# Altium PCB IOT_Speaker-PCB-v2.0.PcbDoc (part 1 of 3)
Units mil, origin at the board's own origin, x right, y up, seen from the top; angles counter-clockwise.
Board outline 2439.55 x 2668.91 mil, 2 copper layers (Top Layer, Bottom Layer), stack 61.811 mil thick; 126 components, 76 nets, 382 pads, 136 vias.
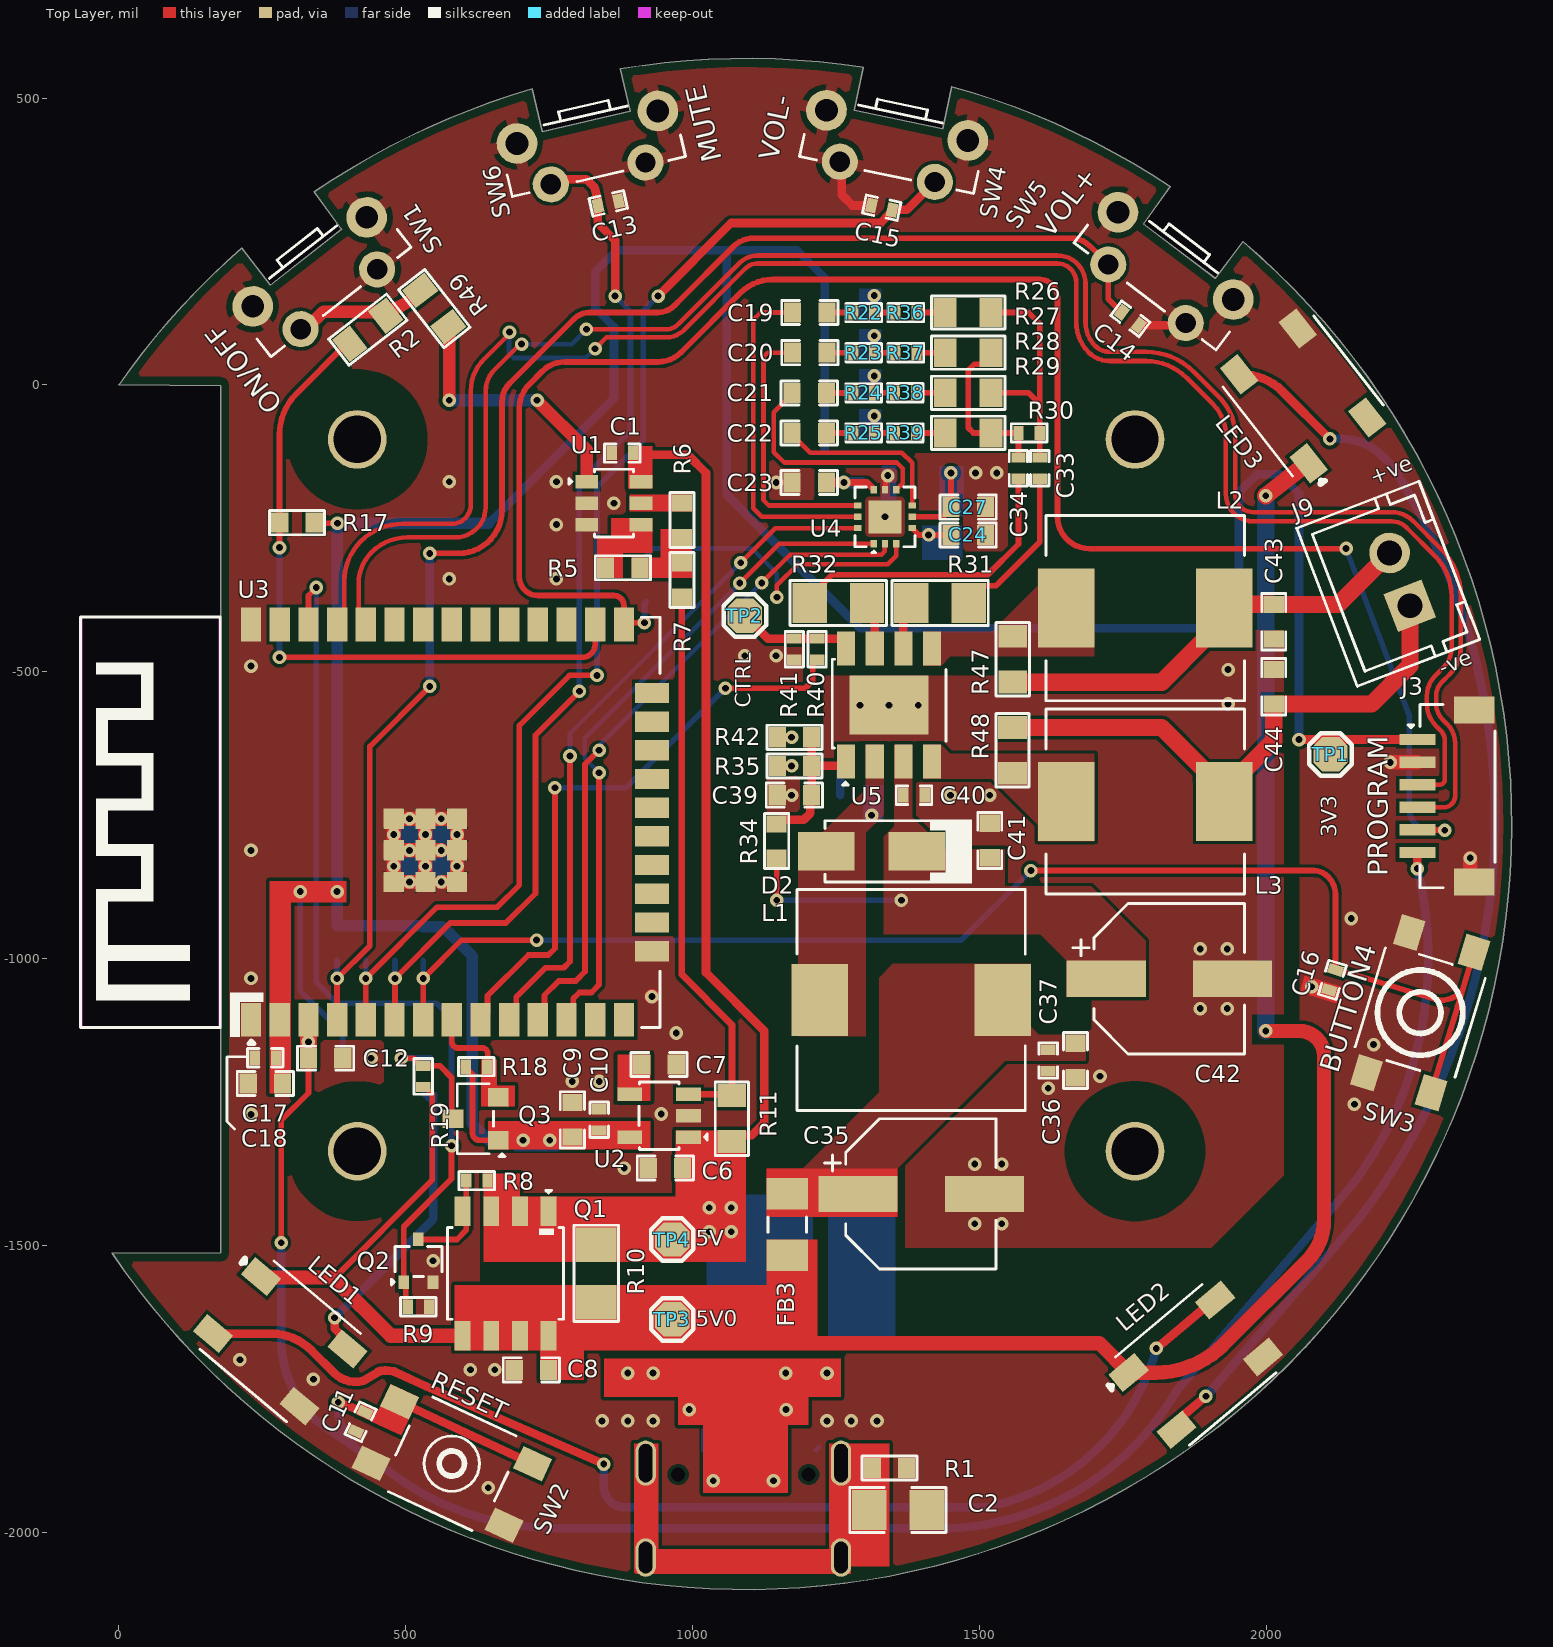
[diagram p0: Top Layer view]
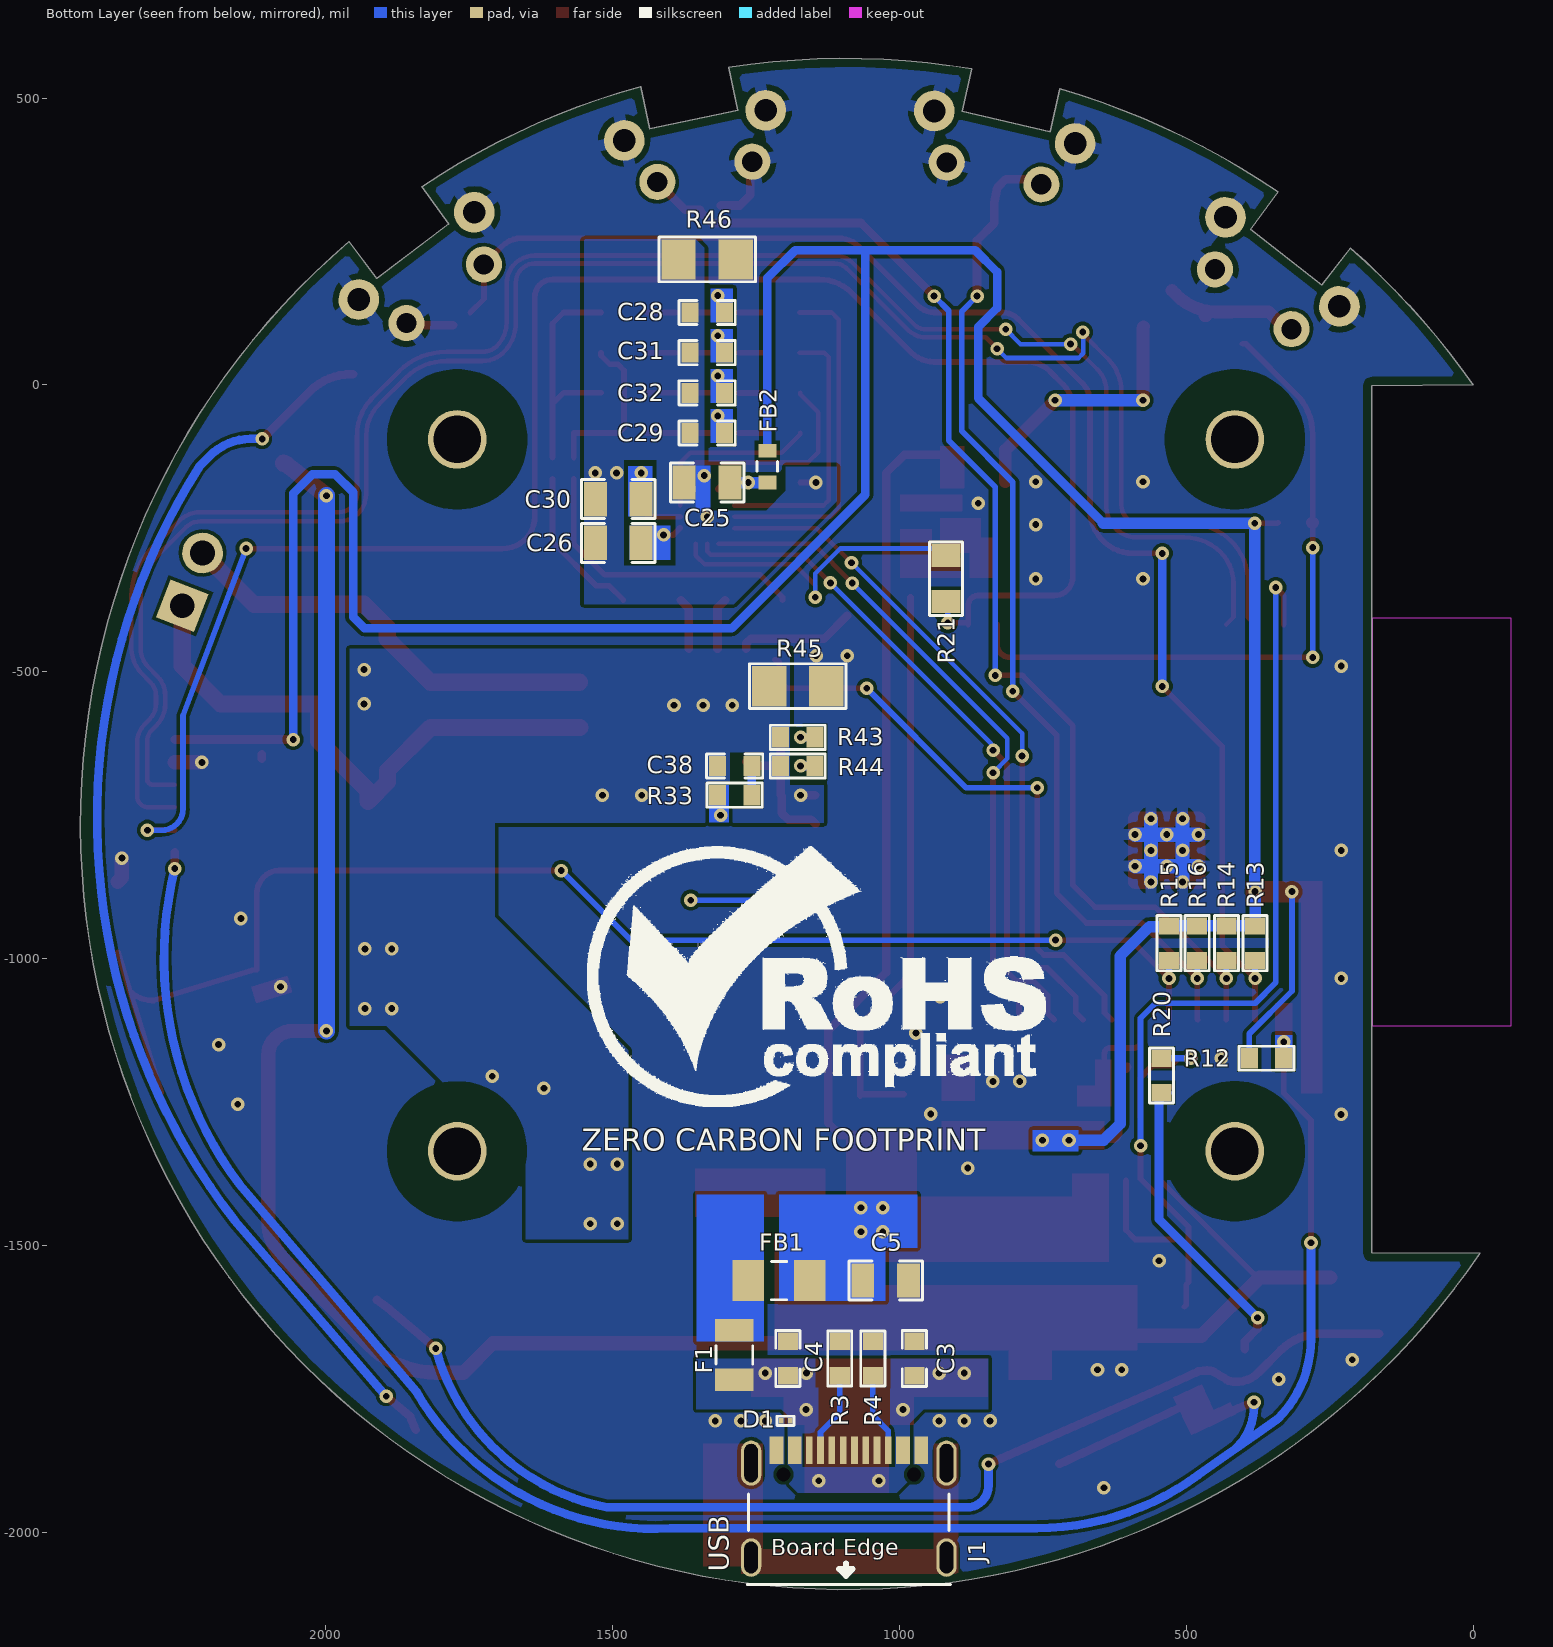
[diagram p1: Bottom Layer view, seen from below]
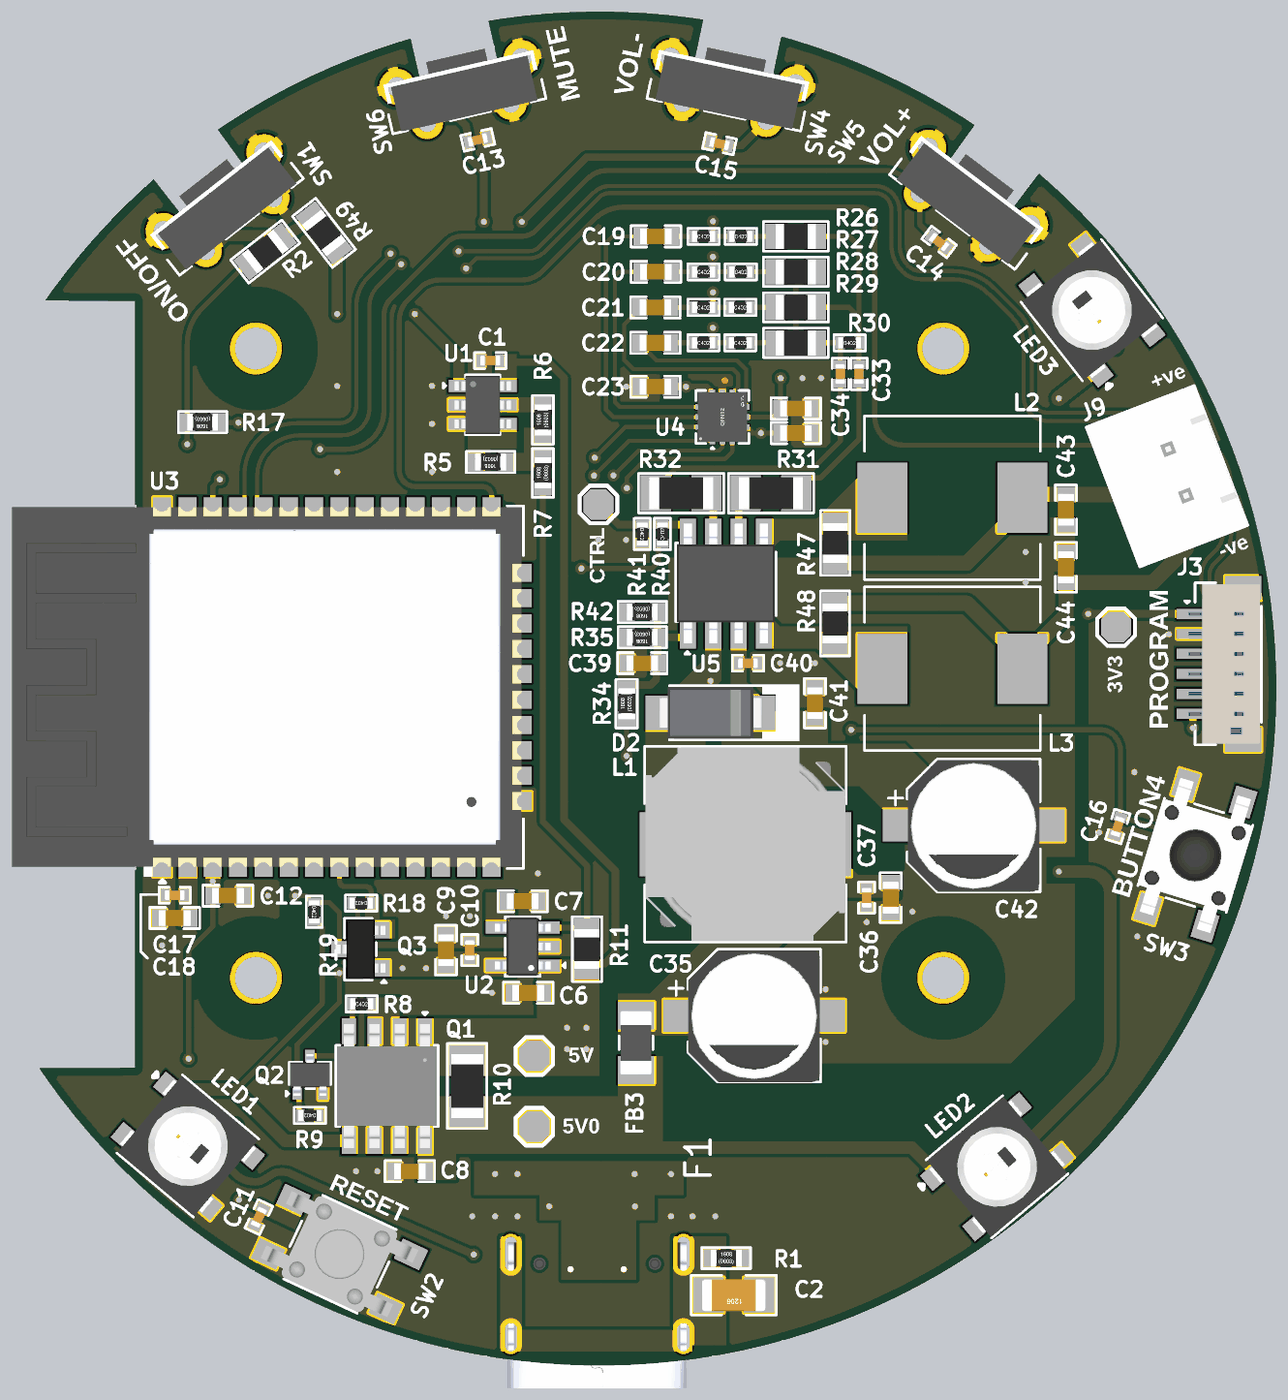
[diagram p3: 3D render of the assembled board from above, using the file's embedded part models]
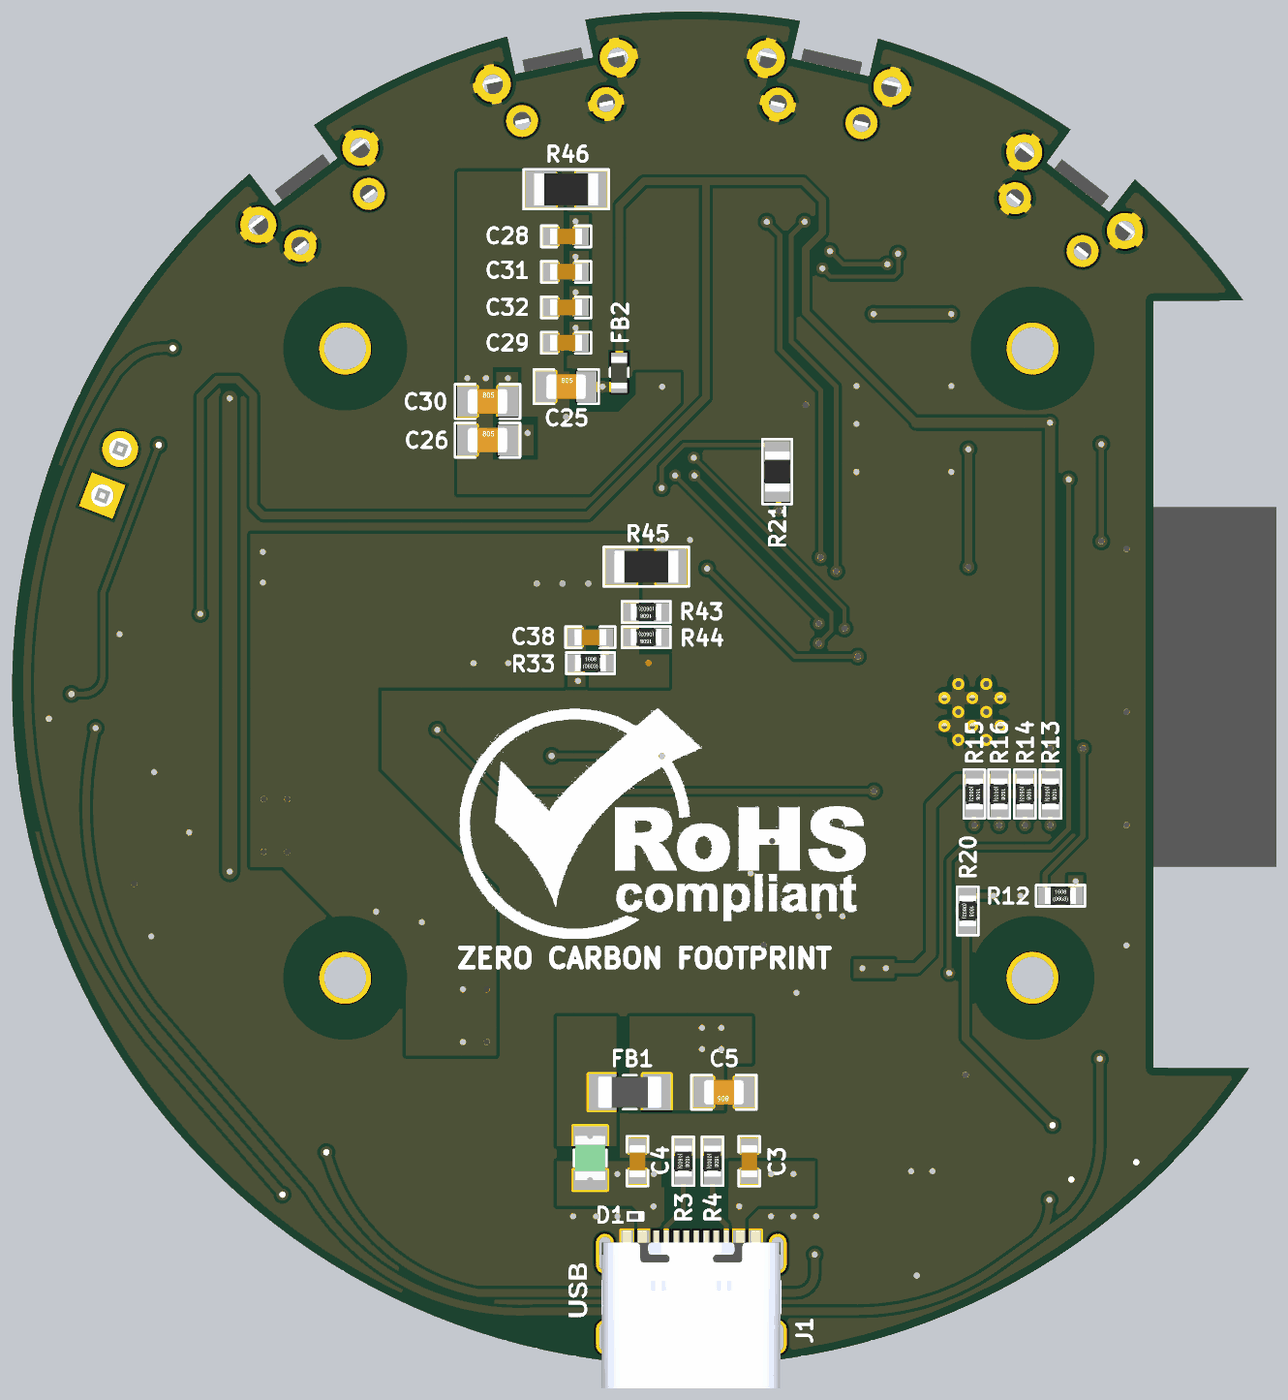
[diagram p4: 3D render of the assembled board from below, using the file's embedded part models]

## Layer stack, top to bottom
Top Solder: solder mask 0.3937, Solder Resist, Dk 3.5
Top Layer: signal copper 1.378
Dielectric 1: dielectric 59.0551, FR-4, Dk 4.8
Bottom Layer: signal copper 1.378
Bottom Solder: solder mask 0.3937, Solder Resist, Dk 3.5

## Board outline
-11.73,-1513.44 177.13,-1512.97 177.13,-1.08 0,-0.01 cw(c1092.1,-764.27) 213.9,238.49 264.02,174.36 388.11,271.32 340.48,336.6 cw(c1092.88,-764.33) 720.47,516.09 737.6,441.8 891.06,477.23 874.02,551.09 cw(c1093.39,-764.03) 1297.6,553.53 1281.77,479.08 1435.83,446.32 1451.54,520.26 cw(c1093.75,-764.46) 1832.72,345.69 1785.99,280.46 1911.1,185.85 1959.53,249.91 cw(c1093.33,-765.28) 1264.47,-2088.77 cw(c1093.33,-765.28) 912.5,-2087.48 cw(c1093.33,-765.28)

## Design rules (kind name [scope] priority, off if disabled: settings)
BoardOutlineClearance [All] p1: gap=0 ignorepadtopadclearanceinfootprint=FALSE except(15: Poly-OutlineEdge)
Clearance "U16 Clearance" [InComponent('U16')] p1: gap=6 ignorepadtopadclearanceinfootprint=FALSE except(4: Arc-Arc Arc-Track Arc-SMDPad Arc-Via Arc-Fill Track-Track Track-SMDPad Track-Via Track-Fill SMDPad-SMDPad SMDPad-Fill SMDPad-Text THPad-Fill Via-Fill Fill-Fill Text-Text; 5: Arc-Poly Arc-Region Track-Poly Track-Region SMDPad-Via SMDPad-Poly SMDPad-Region Via-Poly Via-Region Fill-Poly Fill-Region Poly-Poly Poly-Region Region-Region)
Clearance [All] p2: gap=6 ignorepadtopadclearanceinfootprint=FALSE except(4: Arc-SMDPad Track-SMDPad SMDPad-SMDPad SMDPad-Text Text-Text; 5.8: Via-Fill)
ComponentClearance [All] p1: gap=3 collisioncheckmode=3 verticalgap=5 showdistances=FALSE
DiffPairsRouting DiffPairsRouting_2 [InDifferentialPairClass('USB_Lines')] p1: maxlimit=12 minlimit=12 mostfreqgap=12 toplayer_minwidth=10 toplayer_maxwidth=10 toplayer_prefwidth=10 bottomlayer_minwidth=10 bottomlayer_maxwidth=10 bottomlayer_prefwidth=10 maxuncoupledlength=500
DiffPairsRouting DiffPairsRouting_1 [InDifferentialPairClass('MIC1_IN_Lines')] p2: maxlimit=8 minlimit=8 mostfreqgap=8 toplayer_minwidth=8 toplayer_maxwidth=8 toplayer_prefwidth=8 bottomlayer_minwidth=8 bottomlayer_maxwidth=8 bottomlayer_prefwidth=8 maxuncoupledlength=500
DiffPairsRouting [InDifferentialPairClass('MIC1_Lines')] p3: maxlimit=8 minlimit=8 mostfreqgap=8 toplayer_minwidth=8 toplayer_maxwidth=8 toplayer_prefwidth=8 bottomlayer_minwidth=8 bottomlayer_maxwidth=8 bottomlayer_prefwidth=8 maxuncoupledlength=500
HoleSize [All] p1: absolutevalues=TRUE maxlimit=1000 minlimit=1 maxpercent=80.000 minpercent=20.000
HoleToHoleClearance [All] p1: gap=0 allowstackedmicrovias=TRUE
MinimumSolderMaskSliver [All] p1: minsoldermaskwidth=0
PolygonConnect [All] p1: thpad.connectstyle=Relief thpad.reliefconductorwidth=20 thpad.reliefentries=4 thpad.polygonreliefangle="90 Angle" thpad.airgapwidth=10 smdpad.connectstyle=Direct smdpad.reliefconductorwidth=15 smdpad.reliefentries=4 smdpad.polygonreliefangle="90 Angle" smdpad.airgapwidth=10 via.connectstyle=Direct via.reliefconductorwidth=10 via.reliefentries=4 via.polygonreliefangle="90 Angle" via.airgapwidth=10
RoutingVias [All] p1: holewidth=11.81 width=23.62 viastyle="Through Hole" minholewidth=5.91 minwidth=11.81 maxholewidth=11.81 maxwidth=23.62
SilkToSilkClearance [All] p1: silktosilkclearance=0
SilkToSolderMaskClearance [IsPad] p1: minsilkscreentomaskgap=0 clearancetoexposedcopper=TRUE
SolderMaskExpansion SolderMaskExpansion_Via [IsVia] p1: expansion=4 istentingtop=TRUE
SolderMaskExpansion [All] p2: expansion=4 istentingtop=FALSE
SupplyNets "Schematic Supply Nets_8" [InNet('AGND')] p1: voltage=0.000
SupplyNets "Schematic Supply Nets_7" [InNet('C_AGND')] p2: voltage=0.000
SupplyNets "Schematic Supply Nets_6" [InNet('GND')] p3: voltage=0.000
SupplyNets "Schematic Supply Nets_5" [InNet('VUSB')] p4: voltage=0.000
SupplyNets "Schematic Supply Nets_4" [InNet('3.3V')] p5: voltage=0.000
SupplyNets "Schematic Supply Nets_3" [InNet('5V0')] p6: voltage=0.000
SupplyNets "Schematic Supply Nets_2" [InNet('5V')] p7: voltage=0.000
UnRoutedNet [All] p1: checkbadconnections=TRUE
Width [All] p1: maxlimit=50 minlimit=7 preferedwidth=22 minimp=50.000000 maximp=50.000000 favimp=50.000000
22 further rules are at their usual default settings.

## Classes and differential pairs
component class U_Power_Sheet: C1 C2 C3 C4 C5 C6 C7 C8 C9 C10 D1 F1 FB1 J1 Q1 Q2 R1 R2 R3 R4 R5 R6 R7 R8 R9 R10 R11 R49 SW1 TP1 TP3 TP4 U1 U2
component class U_Controller_Sheet: C11 C12 C13 C14 C15 C16 C17 C18 J3 LED1 LED2 LED3 Q3 R12 R13 R14 R15 R16 R17 R18 R19 R20 R21 SW2 SW3 SW4 SW5 SW6 U3
component class U_Audio_Amplifier: C19 C20 C21 C22 C23 C24 C25 C26 C27 C28 C29 C30 C31 C32 C33 C34 C35 C36 C37 C38 C39 C40 C41 C42 C43 C44 D2 FB2 FB3 J9 L1 L2 L3 R22 R23 R24 R25 R26 R27 R28 R29 R30 R31 R32 R33 R34 R35 R36 R37 R38 R39 R40 R41 R42 R43 R44 R45 R46 R47 R48 TP2 U4 U5

## Components (designator, comment, footprint, x,y, rotation, side; value= is the part's Value field where it differs from the comment)
C1 "100nF" Cap-0402 877.63,-118.65 r0 top locked
C2 "4.7nF" Cap-1206 1358,-1961 r180 top
C3 "10nF" Cap-0603 974.33,-1696.99 r90 bottom
C4 "10nF" Cap-0603 1194.8,-1696.99 r90 bottom
C5 "22uF" Cap-0805 1024.16,-1561 r0 bottom
C6 "1uF" Cap-0603 952.52,-1365 r0 top
C7 "10nF" Cap-0603 941.54,-1184.29 r180 top
C8 "10uF" Cap-0603 719.02,-1716.73 r0 top
C9 "22uF" Cap-0603 790.34,-1280.87 r270 top
C10 "100nF" Cap-0402 837.34,-1280.87 r270 top
C11 "100nF" Cap-0402 421.22,-1807.24 r65 top
C12 "1uF" Cap-0603 360.35,-1173.54 r180 top
C13 "100nF" Cap-0402 852.95,316.54 r193 top
C14 "100nF" Cap-0402 1762.95,115.35 r142.9 top
C15 "100nF" Cap-0402 1329.76,309.02 r348 top
C16 "100nF" Cap-0402 2115.28,-1037.05 r73 top
C17 "22uF" Cap-0603 255.28,-1217.55 r0 top locked
C18 "100nF" Cap-0402 255.28,-1172.55 r0 top locked
C19 "3.3uF" Cap-0603 1204.36,126.33 r0 top
C20 "3.3uF" Cap-0603 1204.36,56.33 r0 top
C21 "3.3uF" Cap-0603 1203.29,-13.76 r0 top
C22 "3.3uF" Cap-0603 1203.29,-83.56 r0 top
C23 "0.1uF" Cap-0603 1203.29,-170 r0 top
C24 "0.1uF" Cap-0603 1480.36,-261.41 r180 top
C25 "10uF" Cap-0805 1335.36,-170 r180 bottom
C26 "10uF" Cap-0805 1490.36,-275.35 r180 bottom
C27 "0.1uF" Cap-0603 1480.36,-212.99 r180 top
C28 "2.2nF" Cap-0603 1335.36,126.33 r0 bottom
C29 "2.2nF" Cap-0603 1335.36,-83.57 r180 bottom
C30 "10uF" Cap-0805 1490.36,-199 r180 bottom
C31 "2.2nF" CAP-0603 1335.36,56.33 r0 bottom
C32 "2.2nF" Cap-0603 1335.36,-13.67 r180 bottom
C33 "100nF" Cap-0402 1605,-144.91 r90 top
C34 "100nF" Cap-0402 1568,-144.91 r90 top
C35 "470uF" RVT1C471M0607 1398,-1421 r0 top
C36 "10uF" Cap-0603 1667.45,-1177.5 r90 top
C37 "1uF" Cap-0402 1620,-1177.5 r90 top
C38 "1nF" CAP-0603 1287.43,-664.08 r180 bottom
C39 "3.3nF" Cap-0603 1177.43,-715.08 r0 top
C40 "1uF" Cap-0402 1385.93,-715.08 r180 top
C41 "10uF" Cap-0603 1518,-794 r270 top
C42 "470uF" RVT1C471M0607 1831,-1046 r0 top
C43 "330pF" Cap-0603 2013,-412.7 r90 top
C44 "330pF" Cap-0603 2013,-526 r90 top
D1 "PESD5V0H1BSFYL" DSN0603-2 1198.74,-1805.66 r0 bottom
D2 "SS34" SMA 1312,-813 r180 top
F1 "BSMD0805L-200" Fuse-0805 1288,-1690.69 r90 bottom
FB1 "BLM31KN121SZ1L" IND-1206 1210,-1561 r180 bottom value=9mR
FB2 "BLM18SG121TZ1D" "IND-0603 (1608 Metric)" 1230.56,-142.44 r90 bottom value=25mR
FB3 "BLM31KN121SZ1L" IND-1206 1165,-1463.54 r270 top value=9mR
J1 "TYPE-C-31-M-12" TYPE-C-31-M-12_ 1214.48,-1856.92 r180 bottom locked
J3 "Voltlink Target" "Voltlink Target" 2312.99,-716.46 r270 top
J9 "WAFER-XH254Z-2A" WAFER-XH254Z-2A 2232.64,-338.82 r111 top locked
L1 "4.7uH" YSLF1045-4R7M 1381,-1072 r180 top
L2 "33uH" ZEMS0840-330M 1789,-389 r0 top
L3 "33uH" ZEMS0840-330M 1789,-726 r0 top
LED1 "WS2812B-XF02/W" WS2812B-XF02/W 281.26,-1667.05 r320 top locked
LED2 "WS2812B-XF02/W" WS2812B-XF02/W 1877.28,-1708.03 r40 top locked
LED3 "WS2812B-XF02/W" WS2812B-XF02/W 2064.28,-19.05 r128 top locked
Q1 "IRF7410TRPBF_TP" SOP-8 674.02,-1548.74 r270 top
Q2 "2SK3018W" SOT-323 522,-1526.73 r0 top
Q3 "Si2302CDS" Sot-23 621.85,-1279.06 r90 top
R1 "1M" Res-0603 1343,-1888 r180 top
R2 "0R" Res-0805 433.82,96.35 r38 top
R3 "5.1K" Res-0603 1104.25,-1696.99 r90 bottom
R4 "5.1K" Res-0603 1046.66,-1696.99 r90 bottom
R5 "DNP" Res-0603 878.35,-318.6 r0 top locked
R6 "DNP" Res-0603 981.35,-235.6 r270 top
R7 "4.7K" Res-0603 981.35,-340 r270 top
R8 "10K" Res-0402 624,-1386.73 r0 top
R9 "10K" Res-0402 522,-1606.73 r180 top
R10 "DNP" Res-1206 832.01,-1548.74 r270 top value=0mR
R11 "0R" Res-0805 1068.45,-1278.78 r270 top
R12 "10K" Res-0603 360.35,-1173.54 r0 bottom
R13 "10K" Res-0603 380.34,-972.99 r90 bottom
R14 "10K" Res-0603 430.34,-972.99 r90 bottom
R15 "10K" Res-0603 481.22,-972.99 r90 bottom
R16 "10K" Res-0603 530.35,-972.99 r90 bottom
R17 "10K" Res-0603 310.34,-239.97 r0 top
R18 "10K" Res-0402 623.07,-1188.19 r180 top
R19 "10K" Res-0402 530.35,-1205.28 r270 top
R20 "1K" Res-0603 543.34,-1203.56 r90 bottom
R21 "0R" Res-0805 919,-337.56 r90 bottom
R22 "470R" Res-0402 1298.31,126.33 r0 top
R23 "470R" Res-0402 1298.31,56.33 r0 top
R24 "470R" Res-0402 1298.31,-13.76 r0 top
R25 "470R" Res-0402 1298.31,-83.57 r0 top
R26 "DNP" Res-0805 1480.26,126.33 r0 top
R27 "DNP" Res-0805 1480.36,56.33 r0 top
R28 "0R" Res-0805 1480.36,-13.67 r0 top
R29 "0R" Res-0805 1480.36,-83.57 r0 top
R30 "DNP" Res-0402 1586.5,-83.57 r0 top
R31 "22K" Res-1206 1431.43,-380 r180 top
R32 "22K" Res-1206 1254,-380 r0 top
R33 "1R" Res-0603 1287.43,-715.08 r0 bottom
R34 "510K" Res-0603 1146.53,-795 r270 top
R35 "110K" Res-0603 1177.43,-664.08 r0 top
R36 "1K" Res-0402 1371.86,126.33 r0 top
R37 "1K" Res-0402 1371.86,56.33 r0 top
R38 "1K" Res-0402 1370.86,-13.67 r0 top
R39 "1K" Res-0402 1370.86,-83.57 r0 top
R40 "18K" Res-0402 1217,-460.5 r90 top value=18kR
R41 "28K" Res-0402 1177.43,-460.5 r270 top
R42 "100K" Res-0603 1177.43,-614.08 r0 top value=100kR
R43 "0R" Res-0603 1177.43,-614.08 r180 bottom
R44 "DNP" Res-0603 1177.43,-664.08 r180 bottom
R45 "0R" Res-1206 1177.43,-525 r0 bottom value=0mR
R46 "0R" Res-1206 1335.36,219 r0 bottom value=0mR
R47 "DNP" Res-0805 1558,-478 r270 top
R48 "DNP" Res-0805 1557.61,-636.81 r90 top
R49 "DNP" Res-0805 549.78,133.28 r308 top
SW1 "TS-1087E-B3D2" TS-1087E-B3D2 358,182 r308 top
SW2 "TS-1109S-C-B" TS-1109S-C-B 580.28,-1880.04 r335 top
SW3 "TS-1109S-B-J" TS-1109S-B-J_ 2268.27,-1094.06 r73 top
SW4 "TS-1087E-B3D2" TS-1087E-B3D2 1348,412 r258 top
SW5 "TS-1087E-B3D2" TS-1087E-B3D2 1817,192 r232.9 top
SW6 "TS-1087E-B3D2" TS-1087E-B3D2 826,409 r283 top
TP1 "TEST POINT" Test-point 2112,-644 r0 top
TP2 "TEST POINT" Test-point 1091,-402 r0 top
TP3 "TEST POINT" Test-point 964.52,-1628.74 r0 top
TP4 "TEST POINT" Test-point 964.52,-1489.53 r0 top
U1 "MAX16054AZT+T" TSOT-23-6 862.76,-205.98 r0 top
U2 "SPX3819M5-L-3-3/TR" SOT-23-5 941.52,-1273.78 r180 top
U3 "ESP32-WROOM-32E-N8R2" "38-SMD Module" 579.95,-762.05 r90 top locked
U4 "ES7149" QFN-12-EP(2.5x2.5) 1335.36,-229.74 r90 top
U5 "HT8691RSPER" 8-SO-EP_ 1342.43,-558.08 r90 top

## Footprints (in the part's own frame and the unit in brackets; to place one, negate y for a bottom-side part, rotate by r counter-clockwise, add the part's x,y. Pads: shape width x height; smd on the part's side, far side on the other; paste and mask are expansions set on the pad)
8-SO-EP_ [mm]
  rect 1.505x0.802 smd: 1(-2.497,1.905) 2(-2.497,0.635) 3(-2.497,-0.635) 4(-2.497,-1.905) 5(2.498,-1.905) 6(2.498,-0.635) 7(2.498,0.635) 8(2.498,1.905)
  rect 2.613x3.502 smd: 9(0,0)
  silkscreen extent -3.53,-2.51 2.03,2.51, body extent -3,-2.45 3,2.45, height 1.7
"38-SMD Module" [mm]
  rect 1.5x0.9 smd: 1(-8.75,8.88) 2(-8.75,7.61) 3(-8.75,6.34) 4(-8.75,5.07) 5(-8.75,3.8) 6(-8.75,2.53) 7(-8.75,1.26) 8(-8.75,-0.01) 9(-8.75,-1.28) 10(-8.75,-2.55) 11(-8.75,-3.82) 12(-8.75,-5.09) 13(-8.75,-6.36) 14(-8.75,-7.63) 25(8.75,-7.63) 26(8.75,-6.36) 27(8.75,-5.09) 28(8.75,-3.82) 29(8.75,-2.55) 30(8.75,-1.28) 31(8.75,-0.01) 32(8.75,1.26) 33(8.75,2.53) 34(8.75,3.8) 35(8.75,5.07) 36(8.75,6.34) 37(8.75,7.61) 38(8.75,8.88)
  rect 0.9x1.5 smd: 15(-5.71,-8.88) 16(-4.44,-8.88) 17(-3.17,-8.88) 18(-1.9,-8.88) 19(-0.63,-8.88) 20(0.64,-8.88) 21(1.91,-8.88) 22(3.18,-8.88) 23(4.45,-8.88) 24(5.72,-8.88)
  rect 0.9x0.9 smd: 39(-2.65,2.56) 40(-1.25,2.56) 41(0.15,2.56) 42(-2.65,1.16) 43(-1.25,1.16) 44(0.15,1.16) 45(-2.65,-0.24) 46(-1.25,-0.24) 47(0.15,-0.24)
  round 0.6 hole 0.3 mask+0: 39_16(-2.65,0.46) 39_16(-2.65,1.86) 39_16(-1.95,1.16) 39_16(-1.95,-0.24) 39_16(-1.95,2.56) 39_16(-1.25,1.86) 39_16(-1.25,0.46) 39_16(-0.55,2.56) 39_16(-0.55,1.16) 39_16(-0.55,-0.24) 39_16(0.15,0.46) 39_16(0.15,1.86)
  Keep-Out Layer region: -9.039,10.287 9.046,10.287 9.046,16.383 -9.039,16.383
  silkscreen extent -9.8,-9.22 9.09,16.43, body extent -9,-9.12 9,16.38, height 3.25
Cap-0402 [mil]
  rect 18x25 smd mask+2.36: 1(-18.5,0) 2(18.5,0)
  silkscreen extent -31,-16 31,16, body extent -20,-10 20,10, height 19
Cap-0603 [mil]
  rect 30x35 smd mask+2.36: 1(-30,0) 2(30,0)
  silkscreen extent -49,-21 49,21, body extent -32,-16 31,16, height 34
CAP-0603 [mil]
  rect 30x35 smd mask+2.36: 1(-30,0) 2(30,0)
  silkscreen extent -49,-21 49,21, body extent -32,-16 31,16, height 34
Cap-0805 [mil] "SMD 0805"
  rect 40x60 smd mask+2.76: 1(-40,0) 2(40,0)
  silkscreen extent -64,-34 64,34, body extent -39,-25 39,25, height 30
Cap-1206 [mil] "SMD 1206"
  rect 60x70 smd: 1(-50,0) 2(50,0)
  silkscreen extent -84,-39 84,39, body extent -63,-31 63,32, height 39
DSN0603-2 [mm]
  rect 0.2x0.24 smd mask+0.055: 1(-0.2,0) 2(0.2,0)
  silkscreen extent -0.38,-0.2 0.38,0.2, body extent -0.3,-0.15 0.3,0.15, height 0.32
Fuse-0805 [mm]
  rect 1x1.7 smd: 1(-1.1,0) 2(1.1,0)
  silkscreen extent -0.41,-0.81 0.41,0.81, body extent -1.1,-0.75 1.1,0.75, height 1.24
"IND-0603 (1608 Metric)" [mm] "0.063\" L x 0.032\" W (1.60mm x 0.80mm)"
  rect 0.6x0.8 smd: 1(-0.7,0) 2(0.7,0)
  silkscreen extent -0.2,-0.46 0.23,0.46, body extent -0.8,-0.4 0.8,0.4, height 0.78
IND-1206 [mm]
  rect 1.4x1.82 smd: 1(-1.36,0) 2(1.36,0)
  silkscreen extent -0.34,-0.85 0.34,0.85, body extent -1.6,-0.8 1.6,0.8, height 1.3
QFN-12-EP(2.5x2.5) [mm]
  rect 0.333x0.28 smd paste+0 mask+0.051: 1(-1.199,0.5) 2(-1.199,0) 3(-1.199,-0.5) 7(1.199,-0.5) 8(1.199,0) 9(1.199,0.5)
  rect 0.28x0.333 smd paste+0 mask+0.051: 4(-0.5,-1.199) 5(0,-1.199) 6(0.5,-1.199) 10(0.5,1.199) 11(0,1.199) 12(-0.5,1.199)
  rect 1.46x1.46 smd paste+0 mask+0.051: 13(0,0)
  silkscreen extent -1.59,-1.33 1.33,1.33, body extent -1.25,-1.25 1.25,1.25, height 0.63
Res-0402 [mil]
  rect 18x25 smd mask+2.17: 1(-18.5,0) 2(18.5,0)
  silkscreen extent -32,-17 32,16, body extent -23,-11 23,11, height 16
Res-0603 [mil]
  rect 30x35 smd: 1(-30,0) 2(30,0)
  silkscreen extent -48,-21 48,21, body extent -31,-17 31,17, height 18
Res-0805 [mil] "SMD 0805"
  rect 40x50 smd: 1(-40,0) 2(40,0)
  silkscreen extent -64,-29 64,29, body extent -39,-25 39,24, height 24
Res-1206 [mil]
  rect 60x70 smd: 1(-50,0) 2(50,0)
  silkscreen extent -84,-39 84,39, body extent -63,-31 63,31, height 24
RVT1C471M0607 [mm]
  rect 3.5x1.6 smd: 1(-2.794,0.279) 2(2.806,0.279)
  silkscreen extent -4.27,-3.05 3.33,3.61, body extent -3.3,-3.05 3.3,3.55, height 7.94
SMA [mm]
  rect 2.5x1.7 smd: 1(-2,0) 2(2,0)
  silkscreen extent -4.45,-1.42 2.06,1.42, body extent -2.6,-1.3 2.6,1.3, height 2.4
SOP-8 [mm]
  rect 1.3x0.7 smd: 1(-2.75,1.905) 2(-2.75,0.635) 3(-2.75,-0.635) 4(-2.75,-1.905) 5(2.75,-1.905) 6(2.75,-0.635) 7(2.75,0.635) 8(2.75,1.905)
  silkscreen extent -3.69,-2.57 2.03,2.57, body extent -3.1,-2.5 3.1,2.5, height 1.76
Sot-23 [mm] "TRANS NPN 40V 0.6A SOT23"
  rect 0.82x0.92 smd: 1(-0.95,-1) 2(0.95,-1) 3(0,1)
  silkscreen extent -1.68,-1.3 1.55,0.81, body extent -1.5,-1.25 1.5,1.25, height 1.05
SOT-23-5 [mm]
  rect 1.1x0.6 smd: 1(-1.3,0.95) 2(-1.3,0) 3(-1.3,-0.95) 4(1.3,-0.95) 5(1.3,0.95)
  silkscreen extent -2.13,-1.5 0.88,1.5, body extent -1.4,-1.45 1.4,1.45, height 1.45
SOT-323 [mm]
  rect 0.47x0.6 smd: 1(-0.65,-0.95) 2(0.65,-0.95) 3(0,0.95)
  silkscreen extent -1.19,-1.07 1.04,0.64, body extent -1,-1.05 1,1.05, height 1.1
Test-point [mil]
  oct 60x60 smd: 1(0,0)
  silkscreen extent -37,-37 37,37
TS-1087E-B3D2 [mm]
  round 1.6 hole 0.9: 1(1.05,2.15) 2(1.05,-2.15)
  round 1.8 hole 1: SH1(-1.05,3.2) SH2(-1.05,-3.2)
  silkscreen extent -2.01,-3.94 1.19,3.94, body extent -1.93,-3.85 1.18,3.85, height 3.75
TS-1109S-B-J_ [mm]
  rect 1.4x1.1 smd: 1(-3.25,1.5) 2(3.25,1.5) 3(3.25,-1.5) 4(-3.25,-1.5)
  silkscreen extent -2.46,-2.31 2.46,2.31, body extent -3.5,-2.25 3.5,2.25, height 7.12
TS-1109S-C-B [mm]
  rect 1.4x1.1 smd: 1(-3.25,-1.5) 2(3.25,-1.5) 3(3.25,1.5) 4(-3.25,1.5)
  silkscreen extent -2.41,-2.31 2.41,2.31, body extent -3.5,-2.25 3.5,2.25, height 4.3
TSOT-23-6 [mm]
  rect 1x0.6 smd: 1(-1.2,0.95) 2(-1.2,0) 3(-1.2,-0.95) 4(1.2,-0.95) 5(1.2,0) 6(1.2,0.95)
  silkscreen extent -1.98,-1.5 0.86,1.5, body extent -1.41,-1.45 1.41,1.45, height 1
TYPE-C-31-M-12_ [mm]
  rect 0.6x1.2 smd: A1/B12(0,0) A4/B9(0.8,0) B1/A12(6.4,0) B4/A9(5.6,0)
  rect 0.3x1.2 smd: A5(1.95,0) A6(2.95,0) A7(3.45,0) A8(4.45,0) B5(4.95,0) B6(3.95,0) B7(2.45,0) B8(1.45,0)
  round 0 hole 0.62 unplated: MH(0.31,-1.07) MH(6.09,-1.07)
  oval 0.9x2 hole 0.6 slot 1.7 at 90 deg: S1(7.525,-0.57) S4(-1.125,-0.57)
  oval 0.9x1.7 hole 0.6 slot 1.4 at 90 deg: S2(7.525,-4.75) S3(-1.125,-4.75)
  silkscreen extent -1.3,-5.94 7.7,-1.93, body extent -1.27,-7.32 7.67,0.58, height 3.31
"Voltlink Target" [mm]
  rect 0.5x1.6 smd: 1(-2.5,-1.262) 2(-1.5,-1.262) 3(-0.5,-1.262) 4(0.5,-1.262) 5(1.5,-1.262) 6(2.5,-1.262)
  rect 1.2x1.8 smd: MP1(-3.8,1.262) MP2(3.8,1.262)
  silkscreen extent -4.06,-1.68 4.06,2.17, body extent -4,-1.49 4,2.11, height 4.25
WAFER-XH254Z-2A [mm]
  rect 1.8x1.8 hole 1.1 paste-2539.97 mask+0.05: 1(-1.25,0)
  round 1.8 hole 1.1 paste-2539.97 mask+0.05: 2(1.25,0)
  silkscreen extent -3.75,-2.35 3.75,3.45, body extent -3.75,-2.35 3.75,3.46, height 7
WS2812B-XF02/W [mm]
  rect 1.5x1 smd: 1(-2.5,1.65) 2(-2.5,-1.65) 3(2.5,-1.65) 4(2.5,1.65)
  silkscreen extent -3.56,-2.55 2.5,2.55, body extent -2.7,-2.5 2.7,2.5, height 1.55
YSLF1045-4R7M [mm]
  rect 2.5x3.2 smd: 1(-4.05,0) 2(4.05,0)
  silkscreen extent -5.05,-4.9 5.05,4.9, body extent -5,-4.85 5,4.85, height 4.5
ZEMS0840-330M [mm]
  rect 2.5x3.5 smd: 1(-3.5,0) 2(3.5,0)
  silkscreen extent -4.4,-4.1 4.4,4.1

## Part data
C1 C10 C11 C13 C14 C15 C16 C18: library part CC0402KRX5R8BB104, "CAP CER 0.1UF 25V X5R 0402", Case Code (Imperial)=0402, Case Code (Metric)=1005, Dielectric=X5R, LCSC Part Number=C106256, Manufacturer=Yageo, Max Operating Temperature=85°C, Min Operating Temperature=-55°C, Resistor Type=Ceramic, Supplier Part Number 1=311-1697-1-ND, Tolerance=10%, Voltage Rating=25V, Capacitance=100nF, Case/Package=0402, Category="Ceramic Capacitors", ComponentLink1Description=http://www.mouser.com/ds/2/447/UPY-GPHC_X5R_4V-to-50V_25-1131599.pdf?src-supplier=Mouser, ComponentLink1URL=http://www.mouser.com/ds/2/447/UPY-GPHC_X5R_4V-to-50V_25-1131599.pdf?src-supplier=Mouser, ComponentLink2Description=http://www.yageo.com/documents/recent/UPY-GPHC_X5R_4V-to-50V-16.pdf?src-supplier=Future+Electronics, ComponentLink2URL=http://www.yageo.com/documents/recent/UPY-GPHC_X5R_4V-to-50V-16.pdf?src-supplier=Future+Electronics, ComponentLink3Description=http://www.yageo.com/documents/recent/UPY-GPHC_X5R_4V-to-50V_25.pdf?src-supplier=Digi-Key, ComponentLink3URL=http://www.yageo.com/documents/recent/UPY-GPHC_X5R_4V-to-50V_25.pdf?src-supplier=Digi-Key, Depth=0.5mm, Halogen Free="Halogen Free", Item Type=Capacitor, Lead Free="Lead Free", Length=0.039inch, Manufacturer Part Number=CC0402KRX5R8BB104, Mount="Surface Mount", Packaging="Tape and Reel", Pricing 1="1=0.10000, 10=0.03800, 50=0.02100, 100=0.01710, 500=0.01224, 1000=0.00961, 2500=0.00874, 5000=0.00804 (USD)", RoHS=Yes, RoHS Compliant=Yes, Series=CC, Stock 1=4598218, Supplier 1=Digi-Key, Thickness=0.022inch, Voltage Rating (DC)=25V, Width=0.02inch
C2: library part CC1206KKX7RCBB472, "CAP CER 4700PF 1KV X7R 1206", Case Code (Imperial)=1206, Case Code (Metric)=3216, Dielectric=X7R, Dielectric Material=Ceramic, LCSC Part Number=C107198, Manufacturer=Yageo, Max Operating Temperature=125°C, Min Operating Temperature=-55°C, Supplier Part Number 1=7130131, Tolerance=10%, Voltage Rating=1kV, Capacitance=4.7nF, Case/Package=1206, Category="Ceramic Capacitors", ComponentLink1Description=https://datasheet.ciiva.com/13208/upy-gp-np0-16v-to-50v-8-13208693.pdf?src-supplier=Mouser, ComponentLink1URL=https://datasheet.ciiva.com/13208/upy-gp-np0-16v-to-50v-8-13208693.pdf?src-supplier=Mouser, ComponentLink2Description=https://datasheet.ciiva.com/11466/hv-11466701.pdf?src-supplier=Avnet, ComponentLink2URL=https://datasheet.ciiva.com/11466/hv-11466701.pdf?src-supplier=Avnet, Depth=1.6mm, Item Type=Capacitor, Lead Free="Lead Free", Length=3.2mm, Manufacturer Part Number=CC1206KKX7RCBB472, Mount="Surface Mount", Number of Pins=2, Packaging="Tape and Reel", Pricing 1="3000=0.02860, 9000=0.02750, 15000=0.02700, 45000=0.02600, 75000=0.02510 (USD)", Radiation Hardening=No, Resistor Type=Ceramic, RoHS=Yes, RoHS Compliant=Yes, Series=CC, Stock 1=180000, Supplier 1="Future Electronics", Termination=SMD/SMT, Thickness=0.057inch, Voltage Rating (DC)=1kV, Weight=0.000571oz, Width=0.063inch
C3 C4 C7: library part CC0603JRNPO9BN103, "CAP CER 10000PF 50V C0G/NPO 0603", Case/Package=0603, LCSC Part Number=C389113, Manufacturer=Yageo, Max Operating Temperature=125°C, Min Operating Temperature=-55°C, Tolerance=5%, Voltage Rating=50V, Capacitance=10nF, Category="Ceramic Capacitors", ComponentLink1Description=http://www.yageo.com/documents/recent/UPY-GP_NP0_16V-to-50V_16.pdf?src-supplier=Digi-Key, ComponentLink1URL=http://www.yageo.com/documents/recent/UPY-GP_NP0_16V-to-50V_16.pdf?src-supplier=Digi-Key, ComponentLink2Description=http://www.yageo.com/exep/pages/download/literatures/ProductSelectionGuide%202014_Final_2.pdf?src-supplier=Digi-Key, ComponentLink2URL=http://www.yageo.com/exep/pages/download/literatures/ProductSelectionGuide%202014_Final_2.pdf?src-supplier=Digi-Key, Item Type=Capacitor, Length=0.063inch, Manufacturer Part Number=CC0603JRNPO9BN103, Mount="Surface Mount", Packaging="Tape and Reel", Pricing 1="1=0.42340, 10=0.29770, 25=0.25590, 100=0.19550, 250=0.19360, 500=0.14320, 1000=0.12060, 3000=0.11930 (USD)", RoHS=Yes, RoHS Compliant=Yes, Stock 1=5425, Supplier 1="Arrow Electronics", Supplier Part Number 1=CC0603JRNPO9BN103, Thickness=0.035inch, Width=0.031inch
C5: library part CC0805MKX5R8BB226, "CAP CER 22UF 25V X5R 0805", Case Code (Imperial)=0805, Case Code (Metric)=2012, Dielectric=X5R, LCSC Part Number=C784585, Manufacturer=Yageo, Max Operating Temperature=85°C, Min Operating Temperature=-55°C, Package Quantity=3000, Supplier Part Number 1=311-1903-1-ND, Tolerance=20%, Voltage Rating=25V, Capacitance=22uF, Case/Package=0805, Category="Ceramic Capacitors", ComponentLink1Description=http://www.mouser.com/ds/2/447/Yageo_UPY-GP_NP0_16V-to-50V_9-358835.pdf?src-supplier=Mouser, ComponentLink1URL=http://www.mouser.com/ds/2/447/Yageo_UPY-GP_NP0_16V-to-50V_9-358835.pdf?src-supplier=Mouser, ComponentLink2Description=http://www.yageo.com/documents/recent/UPY-GPHC_X5R_4V-to-50V_25.pdf?src-supplier=Digi-Key, ComponentLink2URL=http://www.yageo.com/documents/recent/UPY-GPHC_X5R_4V-to-50V_25.pdf?src-supplier=Digi-Key, Halogen Free="Halogen Free", Height=1.25mm, Item Type=Capacitor, Lead Free="Lead Free", Length=0.079inch, Manufacturer Part Number=CC0805MKX5R8BB226, Mount="Surface Mount", Packaging="Tape and Reel", Pricing 1="1=0.47000, 10=0.33300, 50=0.25140, 100=0.21900, 500=0.16222, 1000=0.13789 (USD)", RoHS=Yes, RoHS Compliant=Yes, Stock 1=64970, Supplier 1=Digi-Key, Termination=SMD/SMT, Thickness=0.057inch, Voltage Rating (DC)=25V, Weight=0.000194oz, Width=0.049inch
C6 C12: library part CC0603KRX5R8BB105, "CAP CER 1UF 25V X5R 0603", Case Code (Imperial)=0603, Case Code (Metric)=1608, Dielectric=X5R, LCSC Part Number=C14664, Manufacturer=Yageo, Max Operating Temperature=85°C, Min Operating Temperature=-55°C, Package Quantity=1, Supplier Part Number 1=311-1445-1-ND, Tolerance=10%, Voltage Rating=25V, Capacitance=1uF, Case/Package=0603, Category="Ceramic Capacitors", ComponentLink1Description=https://datasheet.ciiva.com/176/mlccorderingcode-176785.pdf?src-supplier=Digi-Key, ComponentLink1URL=https://datasheet.ciiva.com/176/mlccorderingcode-176785.pdf?src-supplier=Digi-Key, ComponentLink2Description=https://datasheet.ciiva.com/176/mlccorderingcode-176786.pdf?src-supplier=Digi-Key, ComponentLink2URL=https://datasheet.ciiva.com/176/mlccorderingcode-176786.pdf?src-supplier=Digi-Key, ComponentLink3Description=https://datasheet.ciiva.com/176/mlccorderingcode-176787.pdf?src-supplier=Digi-Key, ComponentLink3URL=https://datasheet.ciiva.com/176/mlccorderingcode-176787.pdf?src-supplier=Digi-Key, ComponentLink4Description=https://datasheet.ciiva.com/17436/upy-gphc-x5r-4v-to-50v-12-17436952.pdf?src-supplier=Avnet+Europe, ComponentLink4URL=https://datasheet.ciiva.com/17436/upy-gphc-x5r-4v-to-50v-12-17436952.pdf?src-supplier=Avnet+Europe, ComponentLink5Description=https://datasheet.ciiva.com/7978/1525783-7978171.pdf?src-supplier=Element14, ComponentLink5URL=https://datasheet.ciiva.com/7978/1525783-7978171.pdf?src-supplier=Element14, ComponentLink6Description=https://datasheet.ciiva.com/11586/upy-gphc-x5r-4v-to-50v-12-11586318.pdf?src-supplier=Avnet, ComponentLink6URL=https://datasheet.ciiva.com/11586/upy-gphc-x5r-4v-to-50v-12-11586318.pdf?src-supplier=Avnet, Construction=Flat, Depth=0.8mm, Halogen Free="Halogen Free", Height=0.8mm, Item Type=Capacitor, Lead Free="Lead Free", Length=1.6mm, Manufacturer Part Number=CC0603KRX5R8BB105, Mount="Surface Mount", Number of Pins=2, Packaging="Tape and Reel", Pricing 1="1=0.12000, 10=0.08400, 50=0.04760, 100=0.03940, 500=0.02764, 1000=0.02288 (USD)", Radiation Hardening=No, REACH SVHC="No SVHC", RoHS=Yes, RoHS Compliant=Yes, Series=CC, Stock 1=919939, Supplier 1=Digi-Key, Termination=SMD/SMT, Thickness=0.035inch, Voltage Rating (DC)=25V, Width=0.031inch
C8 C36 C41: library part CC0603KRX5R7BB106, "CAP CER 10UF 16V X5R 0603", Case Code (Imperial)=0603, Case Code (Metric)=1608, LCSC Part Number=C2936601, Manufacturer=Yageo, Max Operating Temperature=85°C, Min Operating Temperature=-55°C, Supplier Part Number 1=311-3486-1-ND, Tolerance=10%, Voltage Rating=16V, Capacitance=10uF, Case/Package=0603, Category="Ceramic Capacitors", ComponentLink1Description=http://www.yageo.com/documents/recent/UPY-GPHC_X5R_4V-to-50V_25.pdf?src-supplier=Digi-Key, ComponentLink1URL=http://www.yageo.com/documents/recent/UPY-GPHC_X5R_4V-to-50V_25.pdf?src-supplier=Digi-Key, Item Type=Capacitor, Manufacturer Part Number=CC0603KRX5R7BB106, Mount="Surface Mount", Packaging="Cut Tape", Pricing 1="1=0.68000, 10=0.48000, 50=0.36300, 100=0.31610, 500=0.23416, 1000=0.19903 (USD)", RoHS=Yes, RoHS Compliant=Yes, Stock 1=240725, Supplier 1=Digi-Key
C9 C17: library part CC0603MRX5R6BB226, "CAP CER 22UF 10V X5R 0603", Case Code (Imperial)=0603, Case Code (Metric)=1608, Dielectric=X5R, LCSC Part Number=C109447, Manufacturer=Yageo, Max Operating Temperature=85°C, Min Operating Temperature=-55°C, Package Quantity=4000, Supplier Part Number 1=311-1819-1-ND, Tolerance=20%, Voltage Rating=10V, Capacitance=22uF, Case/Package=0603, Category="Ceramic Capacitors", ComponentLink1Description=http://www.mouser.com/ds/2/447/Yageo_UPY-GP_NP0_16V-to-50V_9-358835.pdf?src-supplier=Mouser, ComponentLink1URL=http://www.mouser.com/ds/2/447/Yageo_UPY-GP_NP0_16V-to-50V_9-358835.pdf?src-supplier=Mouser, ComponentLink2Description=http://www.yageo.com/documents/recent/UPY-GPHC_X5R_4V-to-50V_25.pdf?src-supplier=Digi-Key, ComponentLink2URL=http://www.yageo.com/documents/recent/UPY-GPHC_X5R_4V-to-50V_25.pdf?src-supplier=Digi-Key, Halogen Free="Halogen Free", Height=0.8mm, Item Type=Capacitor, Lead Free="Lead Free", Length=0.063inch, Manufacturer Part Number=CC0603MRX5R6BB226, Mount="Surface Mount", Packaging="Tape and Reel", Pricing 1="1=0.68000, 10=0.48000, 50=0.36300, 100=0.31610, 500=0.23416, 1000=0.19903 (USD)", RoHS=Yes, RoHS Compliant=Yes, Stock 1=19628, Supplier 1=Digi-Key, Termination=SMD/SMT, Thickness=0.035inch, Voltage Rating (DC)=10V, Weight=7.1E-05oz, Width=0.8mm
C19 C20 C21 C22: library part TCC0603X5R335M250CT, "25V 3.3uF X5R ±20% 0603 Multilayer Ceramic Capacitors MLCC - SMD/SMT ROHS", LCSC Part Number=C5360803, Manufacturer=CCTC, Package=0603, ComponentLink1Description=LCSC, ComponentLink1URL=https://www.lcsc.com/product-detail/Multilayer-Ceramic-Capacitors-MLCC-SMD-SMT_CCTC-TCC0603X5R335M250CT_C5360803.html, Item Type=Capacitor, Manufacturer Part Number=TCC0603X5R335M250CT
C23 C24 C27: library part CC0603JRX7R9BB104, "CAP CER 0.1UF 50V X7R 0603", LCSC Part Number=C91183, Manufacturer=Yageo, ComponentLink1Description=https://datasheet.ciiva.com/11465/upy-gphc-x7r-6-3v-to-50v-8-11465038.pdf?src-supplier=Avnet, ComponentLink1URL=https://datasheet.ciiva.com/11465/upy-gphc-x7r-6-3v-to-50v-8-11465038.pdf?src-supplier=Avnet, Halogen Free=5694HalogenFree, Item Type=Capacitors, Lead Free=5697LeadFree, Manufacturer Part Number=CC0603JRX7R9BB104, Material=4241ConductorMaterial, Pins=2NUMBER, Pricing="4000=0.0077, 16000=0.0073, 60000=0.007, 160000=0.0068, 400000=0.0064 (USD)", RoHS=Yes, Stock=204000, Supplier="Future Electronics"
C25 C26 C30: library part GRM21BZ71E106KE15L, "CAP CER 10UF 25V X7R 0805", Case/Package=339Case, LCSC Part Number=C237493, Manufacturer=Murata, Max Operating Temperature=125°C, Min Operating Temperature=-55°C, Tolerance=10%, Voltage Rating=25V, Height=1.45mm, Item Type=Capacitors, Length=2mm, Manufacturer Part Number=GRM21BZ71E106KE15L, Material=4241ConductorMaterial, Pricing="1=0.34, 10=0.142, 50=0.142, 100=0.096, 1000=0.086, 10000=0.058 (USD)", RoHS=Yes, RoHS Compliant=Yes, Stock=43117, Supplier=Mouser, Thickness=1.25mm, Width=1.25mm
C28 C29 C31 C32: library part AC0603KRX7R7BB222, "CAP CER 2200PF 16V X7R 0603", Case Code (Imperial)=0603, Case Code (Metric)=1608, LCSC Part Number=C726555, Manufacturer=Yageo, Max Operating Temperature=125°C, Min Operating Temperature=-55°C, Ratings=AEC-Q200, Tolerance=10%, Voltage Rating=16V, Case/Package=0603, ComponentLink1Description=http://www.yageo.com/NewPortal/_en/search/productDocs.jsp?YageoPartNumber=AC0603KRX7R7BB222&src-supplier=Digikey, ComponentLink1URL=http://www.yageo.com/NewPortal/_en/search/productDocs.jsp?YageoPartNumber=AC0603KRX7R7BB222&src-supplier=Digikey, Item Type=Capacitor, Manufacturer Part Number=AC0603KRX7R7BB222, Mounting Technology="Surface Mount", Packaging="Cut Tape", Pricing="1=0.11, 10=0.077, 50=0.0444, 100=0.0345, 500=0.02594, 1000=0.02039 (USD)", RoHS=Yes, RoHS Compliant=Yes, Series=AC, Stock=423, Supplier=Digikey
C33 C34: library part CC0402KRX5R7BB104, "CAP CER 0.1UF 16V X5R 0402", Case Code (Imperial)=0402, Case Code (Metric)=1005, Dielectric=X5R, LCSC Part Number=C106204, Manufacturer=Yageo, Max Operating Temperature=85°C, Min Operating Temperature=-55°C, Package Quantity=1, Resistor Type=Ceramic, Supplier Part Number 1=603-CC402KRX5R7BB104, Tolerance=10%, Voltage Rating=16V, Capacitance=100nF, Case/Package=0402, Category="Ceramic Capacitors", ComponentLink1Description=https://datasheet.ciiva.com/155/mlccorderingcode-155879.pdf?src-supplier=Digi-Key, ComponentLink1URL=https://datasheet.ciiva.com/155/mlccorderingcode-155879.pdf?src-supplier=Digi-Key, ComponentLink2Description=https://datasheet.ciiva.com/155/mlccorderingcode-155878.pdf?src-supplier=Digi-Key, ComponentLink2URL=https://datasheet.ciiva.com/155/mlccorderingcode-155878.pdf?src-supplier=Digi-Key, ComponentLink3Description=https://datasheet.ciiva.com/155/mlccorderingcode-155880.pdf?src-supplier=Digi-Key, ComponentLink3URL=https://datasheet.ciiva.com/155/mlccorderingcode-155880.pdf?src-supplier=Digi-Key, ComponentLink4Description=https://datasheet.ciiva.com/11464/upy-gphc-x5r-4v-to-50v-12-11464869.pdf?src-supplier=Avnet, ComponentLink4URL=https://datasheet.ciiva.com/11464/upy-gphc-x5r-4v-to-50v-12-11464869.pdf?src-supplier=Avnet, Construction=Flat, Depth=0.5mm, Halogen Free="Halogen Free", Height=0.5mm, Lead Free="Lead Free", Length=1mm, Manufacturer Part Number=CC0402KRX5R7BB104, Mount="Surface Mount", Number of Pins=2, Packaging="Tape and Reel", Pricing 1="1=0.10000, 10=0.02300, 50=0.02300, 100=0.01100, 1000=0.00600, 10000=0.00400 (USD)", Radiation Hardening=No, REACH SVHC=Unknown, RoHS=Yes, RoHS Compliant=Yes, Series=CC, Stock 1=936792, Supplier 1=Mouser, Termination=SMD/SMT, Thickness=0.022inch, Voltage Rating (DC)=16V, Width=0.02inch
C35 C42: library part RVT1C471M0607, "470uF 16V ±20% SMD,D6.3xL7.7mm Aluminum Electrolytic Capacitors - SMD ROHS", LCSC Part Number=C2977552, Manufacturer=ROQANG, Package=SMD,D6.3xL7.7mm, ComponentLink1Description=LCSC, ComponentLink1URL=https://www.lcsc.com/product-detail/Aluminum-Electrolytic-Capacitors-SMD_ROQANG-RVT1C471M0607_C2977552.html, Item Type=Capacitor, Manufacturer Part Number=RVT1C471M0607
C37 C40: library part CC0402KRX5R8BB105, "CAP CER 1UF 25V X5R 0402", Case Code (Imperial)=0402, Case Code (Metric)=1005, Dielectric=X5R, LCSC Part Number=C326568, Manufacturer=Yageo, Max Operating Temperature=85°C, Min Operating Temperature=-55°C, Package Quantity=10000, Supplier Part Number 1=603-CC402KRX5R8BB105, Tolerance=10%, Voltage Rating=25V, Capacitance=1uF, Case/Package=0402, Category="Ceramic Capacitors", ComponentLink1Description=http://www.mouser.com/ds/2/447/Yageo_UPY-GP_NP0_16V-to-50V_9-358835.pdf?src-supplier=Mouser, ComponentLink1URL=http://www.mouser.com/ds/2/447/Yageo_UPY-GP_NP0_16V-to-50V_9-358835.pdf?src-supplier=Mouser, ComponentLink2Description=http://www.yageo.com/documents/recent/UPY-GPHC_X5R_4V-to-50V_25.pdf?src-supplier=Digi-Key, ComponentLink2URL=http://www.yageo.com/documents/recent/UPY-GPHC_X5R_4V-to-50V_25.pdf?src-supplier=Digi-Key, ComponentLink3Description=https://4donline.ihs.com/images/VipMasterIC/IC/YAGO/YAGO-S-A0006851646/YAGO-S-A0006851646-1.pdf?hkey=6D3A4C79FDBF58556ACFDE234799DDF0&src-supplier=Newark, ComponentLink3URL=https://4donline.ihs.com/images/VipMasterIC/IC/YAGO/YAGO-S-A0006851646/YAGO-S-A0006851646-1.pdf?hkey=6D3A4C79FDBF58556ACFDE234799DDF0&src-supplier=Newark, Halogen Free="Halogen Free", Lead Free="Lead Free", Length=0.039inch, Manufacturer Part Number=CC0402KRX5R8BB105, Mount="Surface Mount", Packaging="Tape and Reel", Pricing 1="1=0.30000, 10=0.20400, 50=0.20400, 100=0.11600, 1000=0.07200, 10000=0.05900 (USD)", RoHS=Yes, RoHS Compliant=Yes, Stock 1=91975, Supplier 1=Mouser, Termination=SMD/SMT, Thickness=0.022inch, Voltage Rating (DC)=25V, Weight=2.3E-05oz, Width=0.02inch
C38: library part CC0603JRNPO8BN102, "CAP CER 1000PF 25V C0G/NPO 0603", Case Code (Imperial)=0603, Case Code (Metric)=1608, Dielectric=C0G, LCSC Part Number=C309470, Manufacturer=Yageo, Max Operating Temperature=125°C, Min Operating Temperature=-55°C, Package Quantity=1, Supplier Part Number 1=311-1342-1-ND, Tolerance=5%, Voltage Rating=25V, Capacitance=1nF, Case/Package=0603, ComponentLink1Description=http://www.farnell.com/datasheets/1132289.pdf?src-supplier=Element14, ComponentLink1URL=http://www.farnell.com/datasheets/1132289.pdf?src-supplier=Element14, ComponentLink2Description=http://www.farnell.com/datasheets/2213336.pdf?src-supplier=Element14, ComponentLink2URL=http://www.farnell.com/datasheets/2213336.pdf?src-supplier=Element14, ComponentLink3Description=http://www.yageo.com/documents/recent/UPY-GP_NP0_16V-to-50V_16.pdf?src-supplier=Digi-Key, ComponentLink3URL=http://www.yageo.com/documents/recent/UPY-GP_NP0_16V-to-50V_16.pdf?src-supplier=Digi-Key, ComponentLink4Description=http://www.yageo.com/exep/pages/download/literatures/ProductSelectionGuide%202014_Final_2.pdf?src-supplier=Digi-Key, ComponentLink4URL=http://www.yageo.com/exep/pages/download/literatures/ProductSelectionGuide%202014_Final_2.pdf?src-supplier=Digi-Key, ComponentLink5Description=http://www.yageo.com/documents/recent/UPY-GP_NP0_16V-to-50V_8.pdf?src-supplier=Avnet, ComponentLink5URL=http://www.yageo.com/documents/recent/UPY-GP_NP0_16V-to-50V_8.pdf?src-supplier=Avnet, ComponentLink6Description=https://www.verical.com/server-webapp/html/getDatasheet?partID=403523&src-supplier=Verical, ComponentLink6URL=https://www.verical.com/server-webapp/html/getDatasheet?partID=403523&src-supplier=Verical, ComponentLink7Description=http://www.yageo.com/documents/recent/UPY-GP_NP0_16V-to-50V_8.pdf?src-supplier=Avnet+Europe, ComponentLink7URL=http://www.yageo.com/documents/recent/UPY-GP_NP0_16V-to-50V_8.pdf?src-supplier=Avnet+Europe, Construction=Flat, Depth=0.8mm, Height=0.8mm, Item Type=Capacitor, Lead Free="Lead Free", Length=1.6mm, Manufacturer Part Number=CC0603JRNPO8BN102, Mount="Surface Mount", Packaging="Tape and Reel", Pricing 1="1=0.1, 10=0.072, 50=0.0394, 100=0.0322, 500=0.02298, 1000=0.01806 (USD)", Radiation Hardening=No, REACH SVHC=Unknown, RoHS Compliant=Yes, Series=CC, Stock 1=290818, Supplier 1=Digi-Key, Termination=SMD/SMT, Thickness=0.035inch, Voltage Rating (DC)=25V, Width=0.031inch
C39: library part CC0603JRNPO9BN332, "CAP CER 3300PF 50V C0G/NPO 0603", LCSC Part Number=C107048, Manufacturer=Yageo, Supplier Part Number=3100707, Category="Ceramic Capacitors", ComponentLink1Description=https://datasheet.ciiva.com/13265/upy-gp-np0-16v-to-50v-8-3714-13265222.pdf?src-supplier=Mouser, ComponentLink1URL=https://datasheet.ciiva.com/13265/upy-gp-np0-16v-to-50v-8-3714-13265222.pdf?src-supplier=Mouser, Item Type=Capacitor, Manufacturer Part Number=CC0603JRNPO9BN332, Pricing="4000=0.0297, 12000=0.0286, 20000=0.0281, 60000=0.0271, 100000=0.0262 (USD)", RoHS=Yes, Stock=4000, Supplier="Future Electronics"
C43 C44: library part CC0603JRNPO9BN331, "CAP CER 330PF 50V C0G/NPO 0603", Capacitor Type=Ceramic, Case/Package=0603, LCSC Part Number=C62784, Manufacturer=Yageo, Max Operating Temperature=125°C, Min Operating Temperature=-55°C, Package Shape=Rectangular, Package Style=SMTMeter, Rated DC Voltage (URdc)=50V, Supplier Part Number 1=8843708, Temperature Characteristics Code=C0G, Tolerance  (fill in as +-)=5%, Category="Ceramic Capacitors", ComponentLink1Description=https://datasheet.ciiva.com:443/pdfs/VipMasterIC/IC/YAGO/YAGO-S-A0009251638/YAGO-S-A0009251638-1.pdf?src-supplier=IHS+Markit, ComponentLink1URL=https://datasheet.ciiva.com:443/pdfs/VipMasterIC/IC/YAGO/YAGO-S-A0009251638/YAGO-S-A0009251638-1.pdf?src-supplier=IHS+Markit, ComponentLink2Description=https://datasheet.ciiva.com/28450/1443161-28450501.pdf?src-supplier=Element14, ComponentLink2URL=https://datasheet.ciiva.com/28450/1443161-28450501.pdf?src-supplier=Element14, ComponentLink3Description=https://datasheet.ciiva.com/144/mlccorderingcode-144957.pdf?src-supplier=Digi-Key, ComponentLink3URL=https://datasheet.ciiva.com/144/mlccorderingcode-144957.pdf?src-supplier=Digi-Key, ComponentLink4Description=https://datasheet.ciiva.com/144/mlccorderingcode-144956.pdf?src-supplier=Digi-Key, ComponentLink4URL=https://datasheet.ciiva.com/144/mlccorderingcode-144956.pdf?src-supplier=Digi-Key, ComponentLink5Description=https://datasheet.ciiva.com/144/mlccorderingcode-144958.pdf?src-supplier=Digi-Key, ComponentLink5URL=https://datasheet.ciiva.com/144/mlccorderingcode-144958.pdf?src-supplier=Digi-Key, ComponentLink6Description=https://datasheet.ciiva.com/8033/1443161-8033739.pdf?src-supplier=Element14, ComponentLink6URL=https://datasheet.ciiva.com/8033/1443161-8033739.pdf?src-supplier=Element14, ComponentLink7Description=https://datasheet.ciiva.com/8033/1443161-8033737.pdf?src-supplier=Element14, ComponentLink7URL=https://datasheet.ciiva.com/8033/1443161-8033737.pdf?src-supplier=Element14, ComponentLink8Description=https://datasheet.ciiva.com/13389/upy-gp-np0-16v-to-50v-8-13389983.pdf?src-supplier=Mouser, ComponentLink8URL=https://datasheet.ciiva.com/13389/upy-gp-np0-16v-to-50v-8-13389983.pdf?src-supplier=Mouser, ComponentLink9Description=https://datasheet.ciiva.com/11587/upy-gp-np0-16v-to-50v-8-11587326.pdf?src-supplier=Avnet, ComponentLink9URL=https://datasheet.ciiva.com/11587/upy-gp-np0-16v-to-50v-8-11587326.pdf?src-supplier=Avnet, ComponentLink10Description=https://datasheet.ciiva.com/26829/getdatasheetpartid-403533-26829382.pdf?src-supplier=Verical, ComponentLink10URL=https://datasheet.ciiva.com/26829/getdatasheetpartid-403533-26829382.pdf?src-supplier=Verical, Dielectric Material=Ceramic, Height=0.8mm, Item Type=Capacitor, JESD-609 Code=e3, Length=1.6mm, Manufacturer Part Number=CC0603JRNPO9BN331, Mounting Technology="Surface Mount", Multilayer=Yes, Packaging="Tape and Reel", Pins=2, Pricing 1="4000=0.00990, 16000=0.00940, 20000=0.00980, 40000=0.00910, 80000=0.00930, 100000=0.00880, 160000=0.00830, 200000=0.00900, 500000=0.00850 (USD)", Reach SVHC Compliant=Yes, RoHS=Yes, RoHS Compliant=Yes, Stock 1=40000, Supplier 1="Future Electronics", Terminal Finish=Nickel, Termination=Wraparound, Tolerance (fill in as +-)=5%, Width=0.8mm
D1: "TVS DIODE 5VWM 6.3VC DSN0603-2", LCSC Part Number=C477989, Manufacturer=Nexperia, Category="ESD and Circuit Protection ICs", ComponentLink1Description=http://www.farnell.com/datasheets/1961312.pdf?src-supplier=Farnell, ComponentLink1URL=http://www.farnell.com/datasheets/1961312.pdf?src-supplier=Farnell, ComponentLink2Description=https://assets.nexperia.com/documents/data-sheet/PESD5V0H1BSF.pdf?src-supplier=Digi-Key, ComponentLink2URL=https://assets.nexperia.com/documents/data-sheet/PESD5V0H1BSF.pdf?src-supplier=Digi-Key, ComponentLink3Description=http://www.farnell.com/datasheets/1961312.pdf?src-supplier=Newark, ComponentLink3URL=http://www.farnell.com/datasheets/1961312.pdf?src-supplier=Newark, Item Type=Diode, Manufacturer Part Number=PESD5V0H1BSFYL, Pricing 1="18000=0.06453, 36000=0.06278, 54000=0.06104, 90000=0.05930, 180000=0.05755, 900000=0.05581, 1800000=0.05406 (USD)", RoHS=Yes, RoHS Compliant=Yes, Stock 1=9000, Supplier 1=Avnet, Supplier Part Number 1=PESD5V0H1BSFYL
D2: "0.5mA@40V 40V Single 3A 0.55V@3A SMA(DO-214AC) Schottky Barrier Diodes (SBD) ROHS", LCSC Part Number=C8678, Manufacturer=MDD, Package=SMA(DO-214AC), ComponentLink1Description=LCSC, ComponentLink1URL=https://www.lcsc.com/product-detail/Schottky-Barrier-Diodes-SBD_MDD-Microdiode-Electronics-SS34_C8678.html, Item Type=Diode, Manufacturer Part Number=SS34
F1: "6V 2A 50A 1W -40℃~+85℃ 4A 4mΩ 5s 45mΩ 0805 Resettable Fuses ROHS", LCSC Part Number=C2757931, Manufacturer=BHFUSE, Package=0805, ComponentLink1Description=LCSC, ComponentLink1URL=https://www.lcsc.com/product-detail/Resettable-Fuses_BHFUSE-BSMD0805L-200_C2757931.html, Item Type=Fuse, Manufacturer Part Number=BSMD0805L-200
FB1 FB3: "FERRITE BEAD 120 OHM 1206 1LN", Case Code (Imperial)=1206, Case Code (Metric)=3216, LCSC Part Number=C710516, Manufacturer=Murata, Max Current Rating=6A, Max Operating Temperature=125°C, Min Operating Temperature=-55°C, Ratings=AEC-Q200, Test Frequency=100MHz, Tolerance=25%, Case/Package=1206, Category="Ferrite Beads and Chips", ComponentLink1Description=https://www.murata.com/en-global/products/productdata/8796751200286/QNFA9115.pdf?src-supplier=Digi-Key, ComponentLink1URL=https://www.murata.com/en-global/products/productdata/8796751200286/QNFA9115.pdf?src-supplier=Digi-Key, Core Material=228ConductorMaterial, ESR=9mR, Height=1.8mm, Item Type="Ferrite Bead", Manufacturer Part Number=BLM31KN121SZ1L, Mounting Technology="Surface Mount", Number of Lines=1, Packaging="Cut Tape", Pricing="1=0.2889, 10=0.1979, 25=0.1782, 100=0.1604, 250=0.1402, 500=0.1315, 1000=0.108, 3000=0.1008, 6000=0.0945 (USD)", RMS Current (Irms)=6A, RoHS=Yes, RoHS Compliant=Yes, Series=BLM, Stock=1640, Supplier="Arrow Electronics", Supplier Part Number=BLM31KN121SZ1L
FB2: "FERRITE BEAD 120 OHM 0603 1LN", LCSC Part Number=C710390, Manufacturer=Murata, RMS Current (Irms)=3A, Supplier Part Number=2234927P, Test Frequency=100MHz, Tolerance=25%, Category="Ferrite Beads and Chips", ComponentLink1Description=https://datasheet.octopart.com/BLM18SG121TZ1D-Murata-datasheet-101965366.pdf?src-supplier=Future+Electronics, ComponentLink1URL=https://datasheet.octopart.com/BLM18SG121TZ1D-Murata-datasheet-101965366.pdf?src-supplier=Future+Electronics, ComponentLink2Description=https://www.murata.com/en-us/products/productdata/8796750610462/QNFA9122.pdf?src-supplier=Digi-Key, ComponentLink2URL=https://www.murata.com/en-us/products/productdata/8796750610462/QNFA9122.pdf?src-supplier=Digi-Key, Core Material=228ConductorMaterial, ESR=25mR, Height=650um, Item Type="Ferrite Bead", Manufacturer Part Number=BLM18SG121TZ1D, Pricing="500=0.033, 1000=0.028, 2000=0.026, 5000=0.024 (GBP)", RoHS=Yes, Stock=19700, Supplier=Rs
J1: "5A 1 16P Female Type-C SMD USB Connectors ROHS", LCSC Part Number=C165948, Manufacturer="Korean Hroparts Elec", ComponentLink1Description=LCSC, ComponentLink1URL=https://www.lcsc.com/product-detail/USB-Connectors_Korean-Hroparts-Elec-TYPE-C-31-M-12_C165948.html, Item Type="USB Connector", Manufacturer Part Number=TYPE-C-31-M-12
J3: library part C145963, "1x6P SH 1 1mm 6 SMD,P=1mm Wire To Board / Wire To Wire Connector ROHS", Manufacturer=BOOMELE, Package=SMD,P=1mm, ComponentLink1Description=LCSC, ComponentLink1URL=https://www.lcsc.com/product-detail/Wire-To-Board-Wire-To-Wire-Connector_BOOMELE-Boom-Precision-Elec-C145963_C145963.html, Item Type=Connector, LCSC Part Number=C145963, Manufacturer Part Number=C145963
J9: "1x2P XH 2P 1 2.54mm 2 -25℃~+85℃ 3A Direct Insert Plugin,P=2.5mm Wire To Board Connector ROHS", LCSC Part Number=C7432682, Manufacturer="Hanbo Electronic", Package=Plugin,P=2.5mm, ComponentLink1Description=LCSC, ComponentLink1URL=https://www.lcsc.com/product-detail/Wire-To-Board-Connector_Hanbo-Electronic-WAFER-XH254Z-2A_C7432682.html, Item Type="Wire to Board Connector", Manufacturer Part Number=WAFER-XH254Z-2A
L1: library part YSLF1045-4R7M, "4.5A 4.7uH ±20% SMD,10.1x10.1mm Power Inductors ROHS", LCSC Part Number=C693870, Manufacturer=YJYCOIN, Package=SMD,10.1x10.1mm, ComponentLink1Description=LCSC, ComponentLink1URL=https://www.lcsc.com/product-detail/Power-Inductors_YJYCOIN-YSLF1045-4R7M_C693870.html, Item Type=Inductor, Manufacturer Part Number=YSLF1045-4R7M
L2 L3: library part ZEMS0840-330M, "3.5A 33uH Integrated molded inductor ±20% 3.5A SMD,8.8x8.2mm Power Inductors ROHS", LCSC Part Number=C41415629, Manufacturer=ZE, Package=SMD,8.8x8.2mm, ComponentLink1Description=LCSC, ComponentLink1URL=https://www.lcsc.com/product-detail/Power-Inductors_ZE-ZEMS0840-330M_C41415629.html, Item Type=Inductor, Manufacturer Part Number=ZEMS0840-330M
LED1 LED2 LED3: "SMD5050 Light Emitting Diodes (LED) ROHS", LCSC Part Number=C4154882, Manufacturer=Worldsemi, Package=SMD5050, ComponentLink1Description=LCSC, ComponentLink1URL=https://www.lcsc.com/product-detail/Light-Emitting-Diodes-LED_Worldsemi-WS2812B-XF02-W_C4154882.html, Item Type="RGB LED", Manufacturer Part Number=WS2812B-XF02/W
Q1: "20V 14A 8.5mΩ@4.5V,8A 600mV SOP-8 MOSFETs ROHS", LCSC Part Number=C5370971, Manufacturer="TECH PUBLIC", Manufacturer Part Number=IRF7410TRPBF, Package=SOP-8, ComponentLink1Description=LCSC, ComponentLink1URL=https://www.lcsc.com/product-detail/MOSFETs_TECH-PUBLIC-IRF7410TRPBF_C5370971.html?s_z=n_IRF7410TRPBF, Item Type=Mosfet
Q2: "30V 100mA 200mW 13Ω@2.5V,1mA 1.5V 1 N-channel SOT-323 MOSFETs ROHS", LCSC Part Number=C5273793, Manufacturer=TWGMC, Package=SOT-323, ComponentLink1Description=LCSC, ComponentLink1URL=https://www.lcsc.com/product-detail/MOSFETs_TWGMC-2SK3018W_C5273793.html?s_z=n_2SK3018T106, Item Type=Mosfet, Manufacturer Part Number=2SK3018W
Q3: "N-CHANNEL 20-V (D-S) MOSFET", LCSC Part Number=C5310968, Manufacturer="TECH PUBLIC", Manufacturer Part Number=SI2302CDS, Package=SOT-23, ComponentLink1Description=LCSC, ComponentLink1URL=https://www.lcsc.com/product-detail/MOSFETs_TECH-PUBLIC-SI2302CDS_C5310968.html, Item Type=Mosfet
R1: library part RC0603FR-071ML, "RES SMD 1M OHM 1% 1/10W 0603", Case Code (Imperial)=0603, Case Code (Metric)=1608, LCSC Part Number=C105578, Manufacturer=Yageo, Max Operating Temperature=155°C, Min Operating Temperature=-55°C, Package Quantity=5000, Power Rating=100mW, Resistance=1MR, Supplier Part Number 1=311-1.00MHRDKR-ND, Temperature Coefficient=100ppm/°C, Tolerance=1%, Voltage Rating=50V, Case/Package=0603, ComponentLink1Description=http://www.farnell.com/datasheets/2167052.pdf?src-supplier=Mouser, ComponentLink1URL=http://www.farnell.com/datasheets/2167052.pdf?src-supplier=Mouser, ComponentLink2Description=http://www.farnell.com/datasheets/2167052.pdf?src-supplier=Element14, ComponentLink2URL=http://www.farnell.com/datasheets/2167052.pdf?src-supplier=Element14, ComponentLink3Description=http://documents.rs-components.com/techlib://itc_doclist_GB.htm?stockno=5048956&src-supplier=RSComponents, ComponentLink3URL=http://documents.rs-components.com/techlib://itc_doclist_GB.htm?stockno=5048956&src-supplier=RSComponents, Composition="Thick Film", Depth=0.8mm, Height=0.45mm, Item Type=Resistor, Lead Free="Lead Free", Length=1.6mm, Manufacturer Part Number=RC0603FR-071ML, Military Standard=Not, Number of Pins=2, Packaging="Tape and Reel", Pricing 1="1=0.1, 10=0.023, 100=0.0094, 1000=0.00421, 2500=0.00366 (USD)", REACH SVHC="No SVHC", Stock 1=3824601, Supplier 1=Digi-Key, Termination=SMD/SMT, Voltage Rating (DC)=50V, Width=0.8mm